# Altium PCB SOM_PCB_6Layer.PcbDoc (part 2 of 6)
Units mil, origin at the board's own origin, x right, y up, seen from the top; angles counter-clockwise.
Board outline 1230 x 2725 mil, 6 copper layers (Top Layer, GND+SHIELD, MidLayer1, MidLayer2, PWR, Bottom Layer), stack 60.8 mil thick; 76 components, 194 nets, 972 pads, 577 vias.
Unrouted connection lines stored in the file: 151.
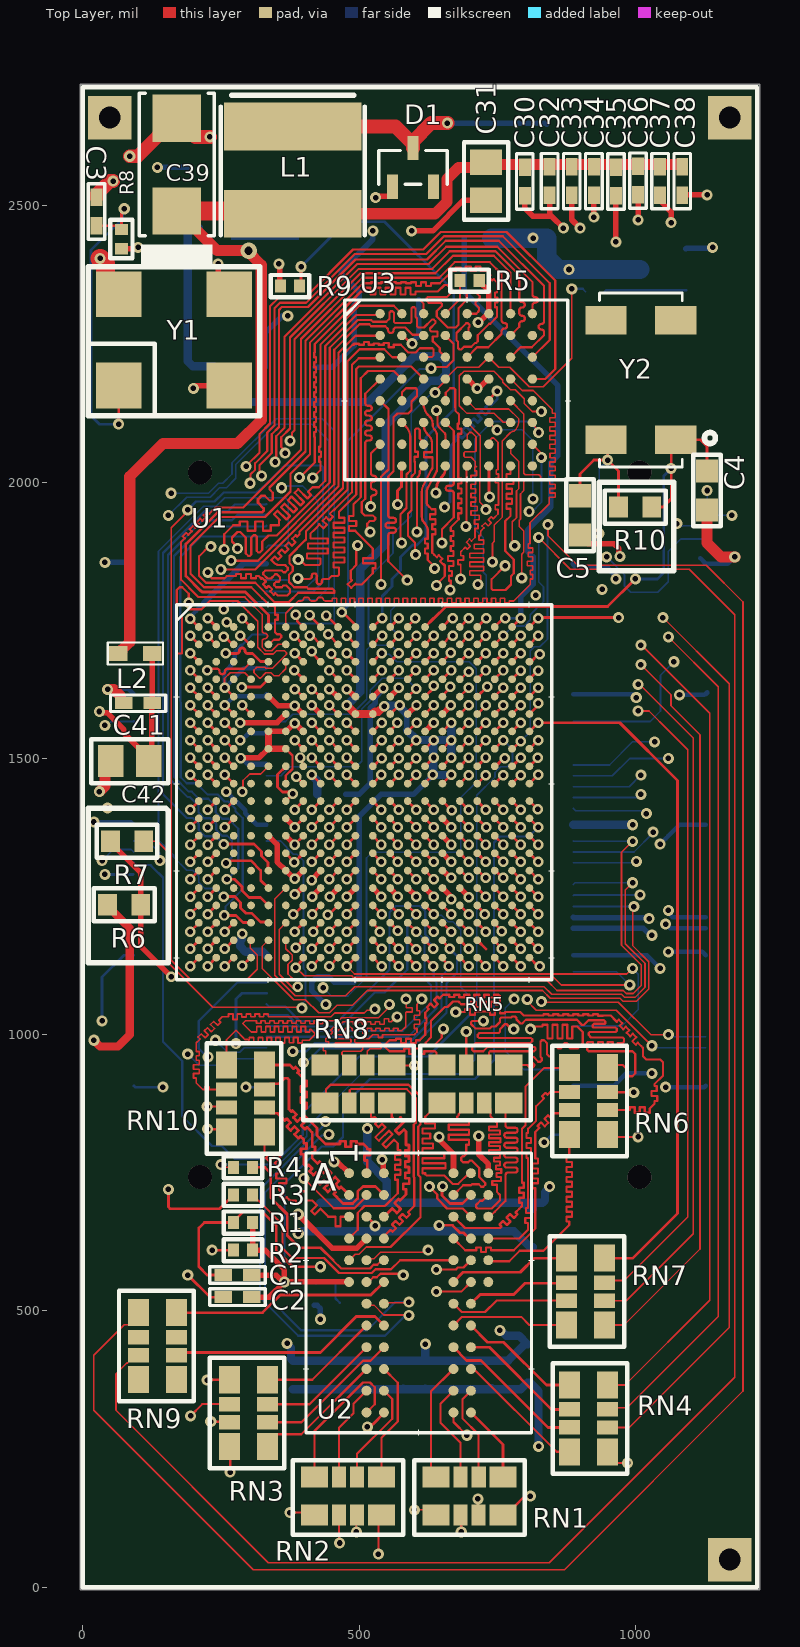
[diagram p0: Top Layer view]

## Part data (continued)
U6: "Trans MOSFET P-CH 20V 3.5A 8-Pin SOIC N T/R", Case/Package=SOIC, Continuous Drain Current (ID)=3.5A, Current Rating=-3.5A, Drain to Source Breakdown Voltage=-20V, Drain to Source Resistance=130mR, Drain to Source Voltage (Vdss)=20V, Gate to Source Voltage (Vgs)=8V, Input Capacitance=405pF, Manufacturer="ON Semiconductor / Fairchild", Manufacturer Part Number=FDS9431A, Max Operating Temperature=175°C, Max Power Dissipation=2.5W, Min Operating Temperature=-55°C, Package Quantity=2500, Threshold Voltage=-600mV, Category=MOSFETs, ComponentLink1Description=https://datasheet.ciiva.com/1256/fds9431a-1256128.pdf?src-supplier=Newark, ComponentLink1URL=https://datasheet.ciiva.com/1256/fds9431a-1256128.pdf?src-supplier=Newark, ComponentLink2Description=https://datasheet.ciiva.com/15137/getdatasheetpartid-70130-15137336.pdf?src-supplier=Verical, ComponentLink2URL=https://datasheet.ciiva.com/15137/getdatasheetpartid-70130-15137336.pdf?src-supplier=Verical, ComponentLink3Description=https://datasheet.ciiva.com/4441/fds9431a-111226-4441596.pdf?src-supplier=Mouser, ComponentLink3URL=https://datasheet.ciiva.com/4441/fds9431a-111226-4441596.pdf?src-supplier=Mouser, ComponentLink4Description=https://datasheet.ciiva.com/932/fds9431a-932295.pdf?src-supplier=Digi-Key, ComponentLink4URL=https://datasheet.ciiva.com/932/fds9431a-932295.pdf?src-supplier=Digi-Key, ComponentLink5Description=https://datasheet.ciiva.com/932/fds9431a-932296.pdf?src-supplier=Digi-Key, ComponentLink5URL=https://datasheet.ciiva.com/932/fds9431a-932296.pdf?src-supplier=Digi-Key, ComponentLink6Description=https://datasheet.ciiva.com/8114/fds9431a-8114667.pdf?src-supplier=Avnet, ComponentLink6URL=https://datasheet.ciiva.com/8114/fds9431a-8114667.pdf?src-supplier=Avnet, ComponentLink7Description=https://datasheet.ciiva.com/932/fds9431a-932294.pdf?src-supplier=Digi-Key, ComponentLink7URL=https://datasheet.ciiva.com/932/fds9431a-932294.pdf?src-supplier=Digi-Key, ComponentLink8Description=https://datasheet.ciiva.com/26141/fds9431a-26141927.pdf?src-supplier=Avnet+Europe, ComponentLink8URL=https://datasheet.ciiva.com/26141/fds9431a-26141927.pdf?src-supplier=Avnet+Europe, ComponentLink9Description=https://datasheet.ciiva.com/8114/fds9431a-8114671.pdf?src-supplier=Avnet, ComponentLink9URL=https://datasheet.ciiva.com/8114/fds9431a-8114671.pdf?src-supplier=Avnet, Contact Plating=Tin,Matte, Dual Supply Voltage=-20V, Element Configuration=Single, Fall Time=21ns, Height=1.5mm, Lead Free="Lead Free", Length=5mm, Mount="Surface Mount", Nominal Vgs=-600mV, Number of Elements=1, Number of Pins=8, On-State Resistance=130mR, Packaging="Tape and Reel", Power Dissipation=2.5W, Pricing 1="1=0.68000, 10=0.59800, 25=0.56160, 100=0.40750, 500=0.34046, 1000=0.28976 (USD)", Radiation Hardening=No, Rds On Max=130mR, REACH SVHC="No SVHC", Rise Time=20ns, RoHS=Yes, Stock 1=2709, Supplier 1=Digi-Key, Termination=SMD/SMT, Turn-Off Delay Time=31ns, Turn-On Delay Time=6.5ns, Voltage Rating (DC)=-20V, Weight=0.2304g, Width=4mm
Y1: library part CPPT7L-BR-25.0TS, "25MHz XO (Standard) TTL Oscillator 3.3V Enable/Disable 4-SMD, No Lead", Digi-Key Part Number=CPPT7L-BR-25.0TS-ND, Manufacturer="Cardinal Components Inc.", Package / Case="4-SMD, No Lead", Frequency=25MHz, Manufacturer Product Number=CPPT7L-BR-25.0TS, Supplier="Cardinal Components Inc."
Y2: library part ECS-.327-12.5-17-TR, "32.768kHz ±20ppm Crystal 12.5pF 50 kOhms 4-SOJ, 5.50mm pitch", Digi-Key Part Number=XC488TR-ND, Manufacturer="ECS Inc.", Frequency=32.768kHz, Manufacturer Product Number=ECS-.327-12.5-17-TR, Supplier="ECS Inc."

## Via types
v1: diameter 19, hole 10, Top Layer to Bottom Layer, tented both sides, 352 vias
v2: diameter 20, hole 10, Top Layer to Bottom Layer, tented both sides, 223 vias
v3: diameter 20, hole 10, Top Layer to Bottom Layer, 1 vias
v4: diameter 30, hole 15, Top Layer to Bottom Layer, tented both sides, 1 vias

## Nets (pads, with @x,y where several pads share a name; then routed paths per layer and width w, separated by ;. In a path a pad name is that pad's centre, name@x,y a point inside that pad or via, vN(x,y) a via of type N, cw(c..) or ccw(c..) an arc to the next point about the centre after c; other vN are vias at no path point)
+2V5: C1.2 C6.1 R1.2 U1.F10 U1.F11 U1.F12 U1.G15 U1.H13 U1.H14 U1.H15 U1.J14 U1.J15 U1.K14 U1.K15 U2.A7 U2.A9 U2.B2 U2.C8 U2.D2 U2.E8 U2.F8 U2.M7 U5.3 | length 5081
  Top Layer w4: v2(400,740) 454,686 491.95,686 513.5,707.55 U2.B2@513.5,710 ; v2(627.15,725) 641.5,710.65 641.5,703.5 659.37,685.63 687.48,685.63 U2.C8@702.48,670.63 ; v2(640,535) 684.96,535 U2.F8@702.48,552.52 ; v2(640,575) 675.31,575 678.81,578.5 689.09,578.5 U2.E8@702.48,591.89 ; U2.M7@670.98,316.3 670.98,299.02 v2(695,275)
  Top Layer w5: C1.2@254.24,565 225,565 210,580 210,650 220,660 R1.2@272.48,660 272.48,661.77 290.71,680 324.43,680 350,654.43 350,610 380,580 v2(430,580) ; v1(477.76,1596) v1@477.87,1596 ; U1.F12@556.5,1580.47 572.24,1596.22 v1(573.75,1596.22) ; U1.H13@587.99,1517.48 v1(603.74,1533.23) ; U1.K14@619.49,1454.49 619.49,1455.22 633.76,1469.5 v1(633.76,1470.24) ; U1.J14@619.49,1485.98 v1(635.24,1501.73) ; U1.H14@619.49,1517.48 v1(635.24,1533.23) ; U1.K15@650.98,1454.49 v1(666.73,1470.24) ; U1.J15@650.98,1485.98 v1(666.61,1501.61) ; U1.H15@650.98,1517.48 v1(666.73,1533.23) ; U1.G15@650.98,1548.98 v1(666.73,1564.72)
  Top Layer w10: v2(390,675) 451.74,613.26 495.5,613.26 U2.D2@513.5,631.26 ; U1.F10@493.39,1580.47 U1.F10@493.5,1580.47 ; v2(645,815) 645,810 670.98,784.02 U2.A7@670.98,749.37 ; v2(716.67,816.67) 716.67,783.28 733.98,765.97 U2.A9@733.98,749.37
  Top Layer w15: v1@477.87,1596 U1.F10@493.39,1580.47 ; U1.F10@493.5,1580.47 U1.F11@525,1580.47 529.25,1584.72 535.27,1584.72 544.74,1594.2 v1(545.82,1594.2)
  MidLayer1 w15: v2(440,1055) 440,985 425,970 425,900 395,870 285,870 260,895 185,895 125,835 125,705 150,680 350,680 370,700 595,700 620,725 v2(627.15,725)
  Bottom Layer w10: v2(440,1055) 439.04,1055 414.14,1079.9 414.14,1094.14 425,1105 445,1105 455,1095 490,1095 500,1105 500,1395 540,1435 598.53,1435 v1(633.76,1470.24) v1@634.5,1470.97 ; 586.76,1550.9 586.76,1579.27
  Bottom Layer w15: C6.1@209.76,2460.87 C6.1@195,2460.87 190,2455.87 190,2218.79 198.79,2210 237.75,2210 U5.3@239.45,2208.3 239.45,2160.55 255,2145 516.87,2145 599.62,2227.75 647.25,2227.75 657.57,2217.43 657.57,2195.15 646.21,2183.8 628.8,2183.8 548.5,2103.5 548.5,1888.5 502.07,1842.07 502.07,1620.32 v1(477.76,1596) ; v1(545.82,1594.2) 546.91,1594.2 548.17,1595.46 572.99,1595.46 v1(573.75,1596.22) ; v1@572.24,1596.22 572.24,1595.14 586.76,1580.62 586.76,1579.27 ; 586.76,1550.9 603.74,1533.92 v1(603.74,1533.23) v1(635.24,1533.23) ; v1(633.76,1470.24) v1(666.73,1470.24) ; v1@634.5,1470.97 634.5,1532.49 v1(635.24,1533.23) ; v1@666.67,1501.61 v1(666.73,1533.23) ; v1(666.73,1533.23) v1(666.73,1533.23) ; v1(666.73,1564.72) v1(666.73,1564.72) v1(666.73,1533.23) ; v1(635.24,1533.23) v1(666.73,1533.23)